# Altium PCB Main-PCB-v1.0-3.PcbDoc (part 4 of 4)
Units mm, origin at the board's own origin, x right, y up, seen from the top; angles counter-clockwise.
Board outline 222.5 x 70.56 mm, 2 copper layers (Top Layer, Bottom Layer), stack 1.448 mm thick; 252 components, 204 nets, 813 pads, 473 vias.
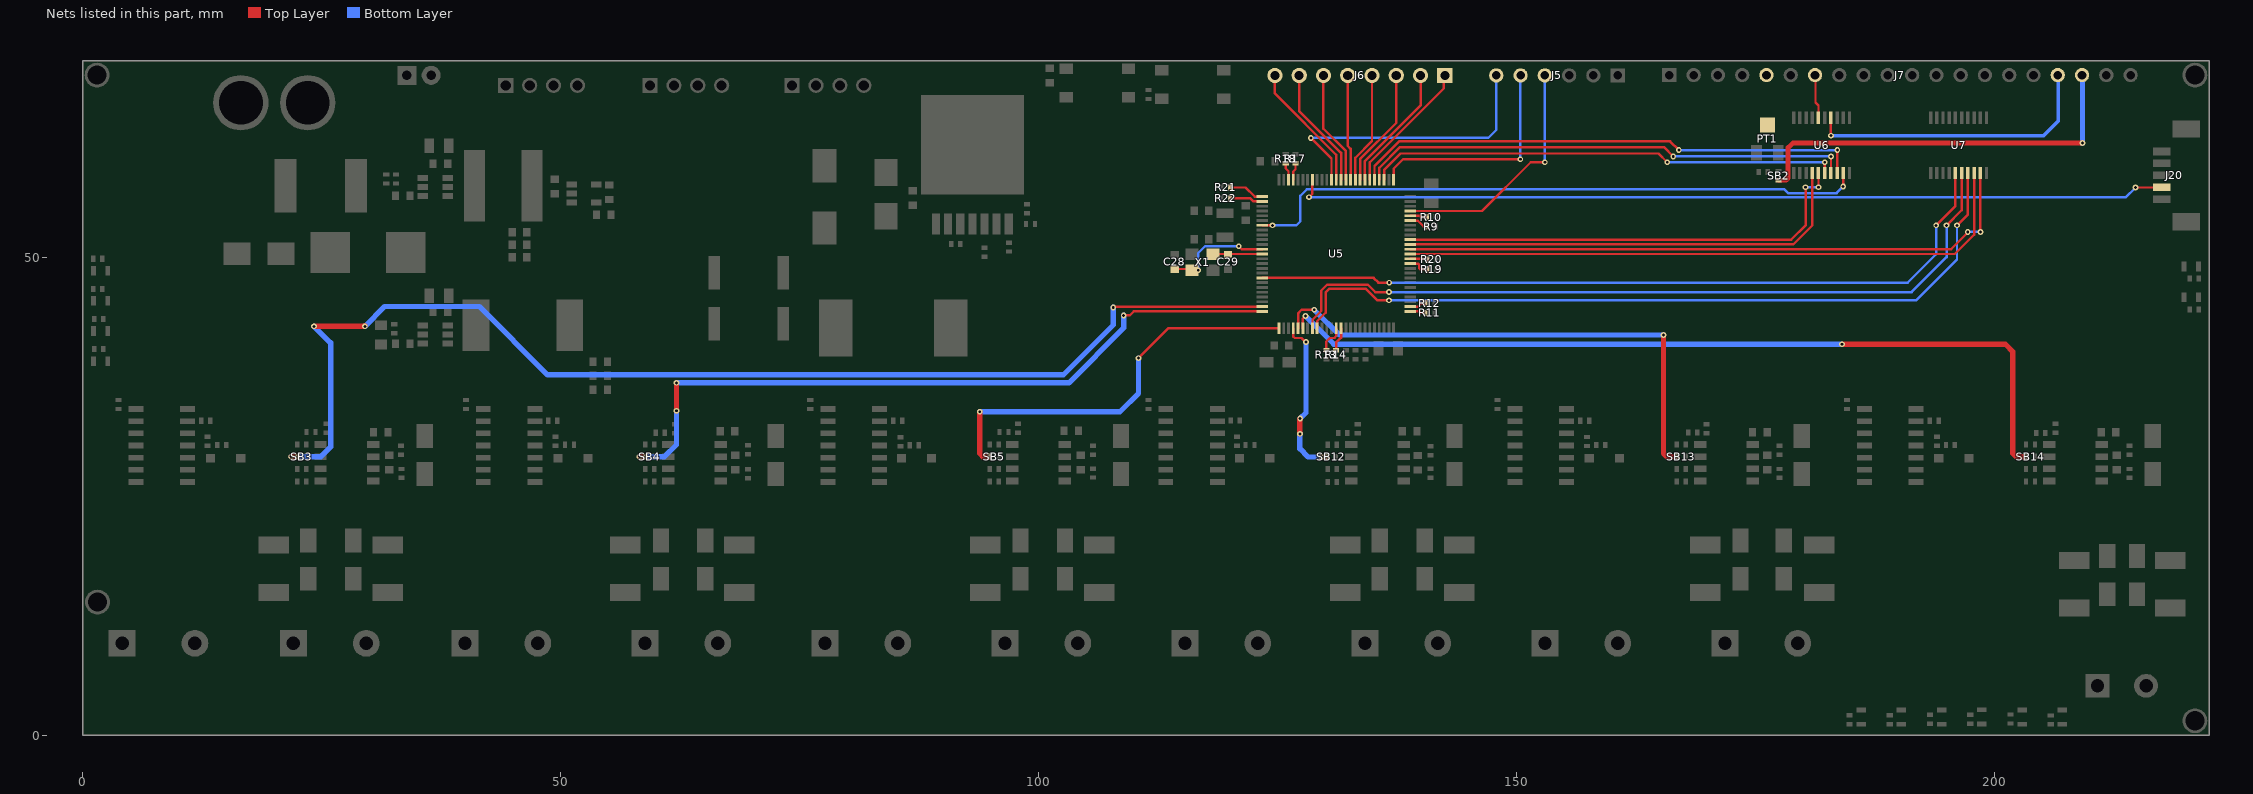
[diagram p3: the nets of this part, all layers, seen from the top]

## Via types
v1: diameter 0.6, hole 0.3, Top Layer to Bottom Layer, 473 vias

## Nets (pads, with @x,y where several pads share a name; then routed paths per layer and width w, separated by ;. In a path a pad name is that pad's centre, name@x,y a point inside that pad or via, vN(x,y) a via of type N, cw(c..) or ccw(c..) an arc to the next point about the centre after c; other vN are vias at no path point) (continued)
PC3: U5.18 U7.5 | length 81.3
  Top Layer w0.254: U5.18@123.41,47.843 135.071,47.843 135.568,47.346 v1(136.703,47.346) ; v1(193.929,53.34) 195.941,55.352 195.941,58.791 U7.5@195.946,58.797
  Bottom Layer w0.254: v1(136.703,47.346) 190.957,47.346 193.929,50.317 v1(193.929,53.34)
PC4: U5.33 U7.6 | length 81.3
  Top Layer w0.254: U5.33@128.66,42.593 128.676,42.609 128.676,43.459 129.591,44.374 129.591,46.519 130.214,47.142 134.454,47.142 135.241,46.355 v1(136.677,46.355) ; v1(195.021,53.34) 196.596,54.915 U7.6@196.596,58.797
  Bottom Layer w0.254: v1(136.677,46.355) 191.364,46.355 195.021,50.013 v1(195.021,53.34)
PC5: U5.34 U7.7 | length 82.1
  Top Layer w0.254: U5.34@129.16,42.593 129.159,42.594 129.159,43.307 130.048,44.196 130.048,46.33 130.404,46.685 134.264,46.685 135.458,45.491 v1(136.677,45.491) ; v1(196.113,53.34) 197.246,54.473 U7.7@197.246,58.797
  Bottom Layer w0.254: v1(136.677,45.491) 191.821,45.491 196.113,49.784 v1(196.113,53.34)
PC6: U5.63 U7.8 | length 66.5
  Top Layer w0.254: U5.63@138.91,50.343 195.881,50.343 197.896,52.358 U7.8@197.896,59.071
PC7: U5.64 U7.9 | length 66.6
  Top Layer w0.254: U5.64@138.91,50.843 195.494,50.843 197.231,52.58 v1(197.231,52.654) ; U7.9@198.546,58.797 198.562,58.781 v1@198.562,52.654
  Bottom Layer w0.254: v1(197.231,52.654) v1(198.577,52.654)
PC8: U5.65 U6.4 | length 48.3
  Top Layer w0.254: U5.65@138.91,51.343 178.978,51.343 180.965,53.33 U6.4@180.965,58.797
PC9: U5.66 U6.5 | length 48.8
  Top Layer w0.254: U5.66@138.91,51.843 178.771,51.843 180.264,53.336 v1(180.264,57.328) ; v1(181.615,57.328) U6.5@181.615,58.797
  Bottom Layer w0.254: v1(180.264,57.328) v1(181.615,57.328)
PC10: U5.78 U6.6 | length 49.4
  Top Layer w0.254: U5.78@136.16,58.093 136.16,59.148 137.871,60.858 164.871,60.858 v1(165.786,59.944) ; U6.6@182.265,58.797 182.268,58.799 182.268,59.941 v1(182.27,59.944)
  Bottom Layer w0.254: v1(165.786,59.944) v1(182.27,59.944)
PC11: U5.79 U6.7 | length 51.6
  Top Layer w0.254: U5.79@135.66,58.093 135.66,59.355 137.824,61.519 165.456,61.519 v1(166.421,60.554) ; U6.7@182.915,58.797 182.923,58.804 182.923,60.546 v1(182.931,60.554)
  Bottom Layer w0.254: v1(166.421,60.554) v1(182.931,60.554)
PC12: U5.80 U6.8 | length 53.8
  Top Layer w0.254: U5.80@135.16,58.093 135.16,59.562 137.727,62.128 166.091,62.128 v1(167.005,61.214) ; U6.8@183.565,58.797 183.578,58.81 183.578,61.201 v1(183.591,61.214)
  Bottom Layer w0.254: v1(167.005,61.214) v1(183.591,61.214)
PC13: U5.7 U6.9 | length 65.8
  Top Layer w0.254: U5.7@123.41,53.343 123.883,53.34 v1(124.485,53.34) ; v1(184.201,57.404) 184.208,57.411 184.208,58.789 U6.9@184.215,58.797
  Bottom Layer w0.254: v1(124.485,53.34) 126.975,53.34 127.406,53.772 127.406,56.439 128.067,57.099 178.049,57.099 178.43,56.718 183.515,56.718 v1(184.201,57.404)
PD0: J6.1 U5.81 | length 14.2
  Top Layer w0.254: U5.81@134.66,58.093 134.66,59.934 142.418,67.691 142.418,68.925 J6.1@142.519,69.026
PD1: J6.2 U5.82 | length 13.3
  Top Layer w0.254: U5.82@134.16,58.093 134.16,60.069 139.979,65.888 J6.2@139.979,69.026
PD2: J6.3 U5.83 | length 12.5
  Top Layer w0.254: U5.83@133.66,58.093 133.66,60.28 137.439,64.059 J6.3@137.439,69.026
PD3: J6.4 U5.84 | length 11.7
  Top Layer w0.254: U5.84@133.16,58.093 133.16,60.415 134.899,62.154 J6.4@134.899,69.026
PD4: J6.5 U5.85 | length 11.1
  Top Layer w0.254: J6.5@132.359,69.026 132.359,61.646 132.66,61.345 U5.85@132.66,58.093
PD5: J6.6 U5.86 | length 12.4
  Top Layer w0.254: J6.6@129.819,69.501 129.819,63.441 132.16,61.1 U5.86@132.16,58.093
PD6: J6.7 U5.87 | length 13
  Top Layer w0.254: J6.7@127.279,69.303 127.279,65.299 131.66,60.918 U5.87@131.66,58.093
PD7: J6.8 U5.88 | length 13.9
  Top Layer w0.254: J6.8@124.739,69.315 124.739,67.132 131.16,60.711 U5.88@131.16,58.093
RS485_CH1_DE_RE: SB3.1 U5.24 | length 125.6
  Top Layer w0.254: v1(107.823,44.755) 107.888,44.82 123.387,44.82 U5.24@123.41,44.843
  Top Layer w0.559: v1(21.808,29.134) SB3.1@22.461,29.134 ; v1(24.206,42.774) 29.453,42.774 29.504,42.824 v1@29.515,42.824
  Bottom Layer w0.559: v1(21.808,29.134) 24.917,29.134 25.933,30.15 25.933,41.046 v1(24.206,42.774) ; v1(29.515,42.774) 31.584,44.843 41.492,44.843 48.641,37.694 102.591,37.694 107.823,42.926 v1(107.823,44.755)
RS485_CH2_DE_RE: SB4.1 U5.25 | length 76.6
  Top Layer w0.254: v1(108.915,43.917) 109.55,43.917 109.976,44.343 U5.25@123.41,44.343
  Top Layer w0.559: v1(58.263,29.134) SB4.1@58.834,29.134 ; v1(62.128,33.934) v1(62.128,36.855)
  Bottom Layer w0.559: v1(58.263,29.134) 60.878,29.134 62.128,30.384 v1(62.128,33.934) ; v1(62.128,36.855) 103.175,36.855 108.915,42.596 v1(108.915,43.917)
RS485_CH3_DE_RE: SB5.1 U5.26 | length 42.6
  Top Layer w0.254: v1(110.465,39.446) 113.611,42.593 U5.26@125.16,42.593
  Top Layer w0.559: v1(93.853,33.833) 93.853,29.461 94.18,29.134 SB5.1@94.907,29.134
  Bottom Layer w0.559: v1@93.864,33.833 108.534,33.833 110.465,35.763 v1(110.465,39.446)
RS485_CH4_DE_RE: SB12.1 U5.29 | length 17
  Top Layer w0.254: U5.29@126.66,42.593 126.66,41.703 126.809,41.554 127.526,41.554 127.958,41.123 v1(127.991,41.123)
  Top Layer w0.559: v1@127.356,31.533 127.356,33.085 127.381,33.11 v1(127.381,33.122) ; v1(129.616,29.108) SB12.1@130.162,29.108
  Bottom Layer w0.559: v1(127.356,31.521) 127.356,29.972 128.219,29.108 v1(129.616,29.108) ; v1(127.381,33.122) 127.991,33.731 v1(127.991,41.123)
RS485_CH5_DE_RE: SB13.1 U5.30 | length 54.9
  Top Layer w0.254: U5.30@127.16,42.593 127.16,44.128 127.533,44.501 v1(128.854,44.501)
  Top Layer w0.559: v1(165.405,41.859) 165.405,29.461 165.732,29.134 SB13.1@166.784,29.134
  Bottom Layer w0.559: v1(128.854,44.501) 131.496,41.859 v1(165.405,41.859)
RS485_CH6_DE_RE: SB14.1 U5.31 | length 89.1
  Top Layer w0.254: U5.31@127.66,42.593 127.66,43.586 v1(127.94,43.866)
  Top Layer w0.559: v1(184.074,40.894) 201.168,40.894 201.955,40.107 201.955,29.461 202.283,29.134 SB14.1@203.335,29.134
  Bottom Layer w0.559: v1(127.94,43.866) 130.912,40.894 v1(184.074,40.894)
RST_LCD: J7.17 U6.14 | length 31.1
  Top Layer w0.254: v1(182.915,62.722) U6.14@182.915,64.597
  Bottom Layer w0.381: v1(182.915,62.722) 205.166,62.722 206.705,64.262 J7.17@206.705,69.063
RW_LCD: J7.7 U6.16 | length 4.6
  Top Layer w0.254: J7.7@181.305,69.063 181.305,66.192 181.615,65.882 U6.16@181.615,64.597
SWCLK: J5.5 U5.76 | length 23.6
  Top Layer w0.254: U5.76@137.16,58.093 137.16,59.262 138.147,60.249 v1(150.419,60.249)
  Bottom Layer w0.254: v1(150.419,60.249) 150.431,60.261 150.431,69.013 J5.5@150.444,69.026
SWDIO: J5.4 U5.72 | length 25.3
  Top Layer w0.254: U5.72@138.91,54.843 146.41,54.843 151.511,59.944 v1(152.984,59.944)
  Bottom Layer w0.254: J5.4@152.984,69.026 152.984,59.969 v1@153.01,59.944
SWO: J5.6 U5.89 | length 30.7
  Top Layer w0.254: v1(128.499,62.484) 130.66,60.322 U5.89@130.66,58.093
  Bottom Layer w0.254: v1(128.499,62.484) 147.07,62.484 147.904,63.319 J5.6@147.904,69.026
UART4_RX: R9.1 U5.70 | length 2.1
  Top Layer w0.254: U5.70@138.91,53.843 138.916,53.837 139.686,53.837 140.31,53.213 R9.1@140.622,53.213 140.622,53.244 R9.1@140.52,53.345
UART4_TX: R10.1 U5.71 | length 1.8
  Top Layer w0.254: U5.71@138.91,54.343 139.891,54.343 140.03,54.204 R10.1@140.622,54.204
UART5_RX: R11.1 U5.51 | length 1.7
  Top Layer w0.254: U5.51@138.91,44.343 139.833,44.343 140.005,44.171 R11.1@140.495,44.171
UART5_TX: R12.1 U5.52 | length 1.7
  Top Layer w0.254: U5.52@138.91,44.843 139.739,44.843 140.034,45.138 140.421,45.138 R12.1@140.495,45.212
UART7_RX: R13.1 U5.38 | length 3
  Top Layer w0.254: R13.1@130.119,40.272 130.119,41.168 130.505,41.554 130.962,41.554 131.166,41.758 131.166,42.588 U5.38@131.16,42.593
UART7_TX: R14.1 U5.39 | length 2.5
  Top Layer w0.254: R14.1@131.141,40.272 131.141,41.073 131.66,41.592 U5.39@131.66,42.593
UART8_RX: R17.1 U5.97 | length 1.9
  Top Layer w0.254: U5.97@126.66,58.093 126.66,58.969 126.893,59.202 R17.1@126.893,59.855
UART8_TX: R18.1 U5.98 | length 1.9
  Top Layer w0.254: R18.1@125.877,59.855 125.877,59.289 126.16,59.006 U5.98@126.16,58.093
UART9_RX: R19.1 U5.61 | length 2.4
  Top Layer w0.254: U5.61@138.91,49.343 139.716,49.343 139.827,49.232 139.827,48.844 139.929,48.743 R19.1@140.665,48.743 140.665,48.753 R19.1@140.564,48.854
UART9_TX: R20.1 U5.62 | length 1.7
  Top Layer w0.254: U5.62@138.91,49.843 140.597,49.843 R20.1@140.64,49.886
UART10_RX: R21.1 U5.1 | length 3.7
  Top Layer w0.254: R21.1@120.073,57.302 121.666,57.302 122.628,56.341 123.408,56.341 U5.1@123.41,56.343
UART10_TX: R22.1 U5.2 | length 3.5
  Top Layer w0.254: R22.1@120.048,56.159 122.174,56.159 122.491,55.843 U5.2@123.41,55.843
V0: J7.5 PT1.2
V_EN: J20.2 U5.93 | length 91.6
  Top Layer w0.254: v1(128.295,56.286) 128.66,56.651 U5.93@128.66,58.093 ; v1(214.782,57.302) 217.522,57.302 J20.2@217.541,57.321
  Bottom Layer w0.254: v1(128.295,56.286) 213.792,56.286 v1@214.782,57.277
VEE: J7.18 SB2.1 | length 42.4
  Top Layer w0.508: SB2.1@177.45,58.052 178.219,58.052 178.435,58.268 178.435,61.468 178.918,61.951 v1(209.245,61.951)
  Bottom Layer w0.559: v1(209.245,61.951) J7.18@209.245,69.063
XTAL_IN: C28.2 U5.12 X1.1 | length 11.4
  Top Layer w0.254: C28.2@114.32,48.768 115.926,48.768 X1.1@116.065,48.629 116.077,48.641 v1(116.713,48.641) ; v1(120.955,51.156) 121.268,50.843 U5.12@123.41,50.843
  Bottom Layer w0.254: v1(116.713,48.641) 116.713,50.444 117.424,51.156 v1(120.955,51.156)
XTAL_OUT: C29.2 U5.13 X1.3 | length 5.2
  Top Layer w0.254: X1.3@118.265,50.329 118.279,50.343 U5.13@123.41,50.343
pads on no net: U5.3 U5.4 U5.5 U5.23 U5.32 U5.35 U5.36 U5.37 U5.43 U5.44 U5.45 U5.46 U5.47 U5.53 U5.54 U5.55 U5.56 U5.57 U5.58 U5.59 U5.60 U5.67 U5.68 U5.69 U5.77 U5.90 U5.95 U5.96 U6.1 U6.3 U6.18 U6.20

## Polygon pours and split planes (outlines as drawn)
GND on Bottom Layer "GND_L02_P001" (solid, remove dead copper, pour order 1): 2.515,67.97 219.964,67.97 219.964,2.54 219.939,2.54 2.515,2.54
GND on Top Layer "GND_L01_P000" (solid, remove dead copper, pour order 0): 2.515,67.97 219.964,67.97 219.964,2.54 219.939,2.54 2.515,2.54

## Other copper
Top Layer:
  rectangle net 12V: 0.635,16.129 4.775,18.411
  region net 12V: 3.146,18.415 3.146,10.265 4.826,10.265 4.826,18.415
  region net 12V: 0.657,36.961 0.657,16.993 2.718,16.993 2.718,36.961
  region net 12V: 9.224,37.516 0.66,37.516 0.66,36.097 9.224,36.097
  region net 12V: 20.549,38.281 4.115,38.281 4.115,36.093 20.549,36.093
  region net 12V: 50.927,37.44 50.927,39.134 4.115,39.134 4.115,37.44
  rectangle net MCU_UART1_RX: 4.724,28.626 6.756,30.607
  rectangle net NetC3_1: 37.541,41.504 40.185,42.367
  rectangle net NetC3_1: 39.624,39.345 42.647,45.593
  rectangle net 12V: 30.404,37.49 32.004,41.402
  rectangle net 24V: 99.39,51.867 101.422,53.848
  rectangle net NetC15_1: 82.779,50.825 91.288,51.918
  rectangle net NetC15_1: 82.347,50.825 85.776,55.804
  rectangle net NetC15_1: 88.976,39.573 91.288,51.816
  region net 12V: 44.704,12.116 36.17,12.116 36.17,0.102 44.704,0.102
  region net 12V: 8.821,12.116 0.286,12.116 0.286,0.102 8.821,0.102
  region net 12V: 44.704,0.102 44.704,7.264 0.305,7.264 0.305,0.102
  region net 24V: 156.808,0.127 156.808,7.29 112.409,7.29 112.409,0.127
  region net 24V: 120.924,12.141 109.377,12.141 109.377,0.127 120.924,0.127
  region net 24V: 156.808,12.141 148.273,12.141 148.273,0.127 156.808,0.127
  region net 24V: 118.254,0.127 118.254,7.29 73.855,7.29 73.855,0.127
  rectangle net 24V: 70.942,0.127 82.389,12.141
  rectangle net BATT: 74.727,50.495 80.239,55.829
  rectangle net GND: 213.563,67.259 218.745,70.18
  region net 24V: 79.417,11.151 71.12,11.151 71.12,8.128 79.417,8.128
  rectangle net 24V: 70.917,8.255 73.66,24.816
  rectangle net 24V: 55.702,23.444 56.998,40.208
  rectangle net NetD1_2: 18.999,48.285 29.769,53.162
  rectangle net NetD1_2: 27.127,48.285 29.769,60.427
  rectangle net BATT: 27.153,62.941 39.421,67.208
  rectangle net 24V: 55.702,39.192 80.95,45.618
  rectangle net BATT: 86.208,54.94 86.843,55.956
  rectangle net 3.3V: 121.183,65.024 123.241,70.307
  rectangle net NRST: 102.184,65.735 110.185,67.31
  rectangle net RS485_CH3_DE_RE: 94.544,28.804 95.25,29.464
  rectangle net GND: 213.563,60.63 221.539,67.259
  rectangle net MCU_UART3_TX: 130.791,39.091 131.477,39.675
  rectangle net MCU_UART3_RX: 129.769,39.091 130.454,39.675
  rectangle net GND: 218.669,50.825 221.539,64.414
  rectangle net 3.3V: 117.932,33.757 138.869,36.347
  rectangle net 5V: 45.872,49.403 48.158,66.523
  rectangle net GND: 36.373,55.855 37.287,56.718
  rectangle net 5V: 31.42,56.667 32.106,57.988
  rectangle net GND: 32.461,57.442 33.147,58.001
  rectangle net GND: 35.23,59.334 37.287,62.535
  rectangle net GND: 145.999,12.37 151.181,26.949
  rectangle net GND: 158.865,8.128 164.504,24.282
  rectangle net GND: 145.999,12.37 164.504,24.282
  rectangle net GND: 112.497,12.37 115.291,26.975
  rectangle net GND: 121.199,8.128 126.837,24.282
  rectangle net GND: 112.497,12.37 126.837,24.282
  rectangle net GND: 74.016,12.37 80.433,26.873
  rectangle net GND: 83.532,8.128 89.171,24.282
  rectangle net GND: 78.3,12.37 89.171,24.282
  rectangle net GND: 39.472,12.37 42.767,26.873
  rectangle net GND: 45.866,8.128 51.504,24.282
  rectangle net GND: 40.633,12.37 51.504,24.282
  rectangle net GND: 5.334,12.37 15.621,24.282
  rectangle net GND: 9.982,8.128 15.621,24.282
  rectangle net GND: 4.75,18.872 7.518,26.873
  rectangle net 3.3V: 46.487,33.503 53.848,35.433
  rectangle net RS485_CH6_DE_RE: 203.098,28.804 203.632,29.464
  rectangle net RS485_CH5_DE_RE: 166.548,28.804 167.081,29.464
  rectangle net 3.3V: 157.531,53.594 179.603,57.302
  rectangle net 3.3V: 157.531,53.594 164.846,60.376
  rectangle net 5V: 216.84,55.563 218.465,56.579
  rectangle net XTAL_IN: 113.792,48.006 117.018,49.225
  rectangle net 3.3V: 122.809,45.695 124.547,46.507
  region net MCU_UART6_RX: 119.413,57.556 118.854,57.556 118.854,56.921 119.413,56.921
  rectangle net GND: 121.234,54.585 122.123,55.778
  rectangle net 3.3V: 48.438,59.03 55.722,63.144
  rectangle net GND: 50.775,65.557 64.872,66.929
  rectangle net GND: 50.775,66.065 52.654,70.307
  rectangle net GND: 65.862,66.065 67.742,70.307
  rectangle net MCU_UART5_RX: 141.326,48.412 141.834,49.073
  rectangle net MCU_UART4_RX: 126.568,60.427 127.229,61.025
  rectangle net MCU_UART4_TX: 125.552,60.427 126.213,61.025
  region net MCU_UART2_TX: 141.714,45.517 141.155,45.517 141.155,44.806 141.714,44.806
  rectangle net MCU_UART2_RX: 141.155,43.917 141.714,44.552
  rectangle net GND: 54.254,32.563 55.499,39.649
  rectangle net MCU_UART1_RX: 141.224,52.883 141.85,53.543
  rectangle net MCU_UART1_TX: 141.224,53.873 141.85,54.534
  rectangle net GND: 13.068,32.563 13.627,33.122
  rectangle net GND: 49.385,32.563 55.474,33.299
  rectangle net GND: 85.479,32.563 86.037,33.122
  rectangle net GND: 120.79,32.588 121.349,33.147
  rectangle net GND: 157.335,32.563 157.894,33.122
  rectangle net GND: 193.911,32.563 194.47,33.299
  region net 3.3V: 201.295,35.687 182.702,35.687 182.702,34.646 201.295,34.646
  rectangle net 3.3V: 191.008,33.757 195.021,35.433
  region net 3.3V: 156.134,35.687 146.279,35.687 146.279,34.646 156.134,34.646
  rectangle net 3.3V: 154.457,33.757 156.134,35.433
  region net 3.3V: 119.609,36.855 83.617,36.855 83.617,34.646 119.609,34.646
  rectangle net 3.3V: 117.932,33.757 119.609,35.433
  region net 3.3V: 84.201,36.855 66.065,36.855 66.065,34.646 84.201,34.646
  rectangle net 3.3V: 82.525,33.757 84.201,35.433
  region net 3.3V: 48.164,35.433 25.07,35.433 25.07,34.646 48.164,34.646
  rectangle net 3.3V: 10.16,33.757 11.836,35.433
  region net 3.3V: 11.836,35.433 3.378,35.433 3.378,34.646 11.836,34.646
  region net NetLED3_2: 184.522,1.41 184.522,0.724 186.706,0.724 186.706,1.41
  region net NetLED6_2: 188.733,1.41 188.733,0.724 190.917,0.724 190.917,1.41
  region net NetLED7_2: 192.943,1.46 192.943,0.775 195.127,0.775 195.127,1.46
  region net NetLED10_2: 197.154,1.46 197.154,0.775 199.338,0.775 199.338,1.46
  region net NetLED8_2: 201.364,1.486 201.364,0.8 203.548,0.8 203.548,1.486
  region net NetLED11_2: 205.575,1.384 205.575,0.698 207.759,0.698 207.759,1.384
  rectangle net 3.3V: 33.02,26.06 33.68,27.153
  rectangle net 3.3V: 69.291,26.035 69.952,27.127
  rectangle net 3.3V: 105.39,26.098 106.05,27.191
  rectangle net 3.3V: 140.696,26.086 141.356,27.178
  rectangle net 3.3V: 177.216,26.06 177.876,27.153
  rectangle net 3.3V: 213.843,26.06 214.503,27.153
  region net NetLED12_2: 221.678,46.386 220.993,46.386 220.993,44.202 221.678,44.202
  region net NetLED9_2: 221.678,49.603 220.993,49.603 220.993,47.418 221.678,47.418
  rectangle net 3.3V: 112.192,68.91 123.241,70.307
  rectangle net GND: 110.973,67.285 111.963,70.307
  rectangle net GND: 97.358,69.139 111.963,70.307
  rectangle net GND: 1.829,43.234 2.362,43.869
  rectangle net GND: 1.829,40.087 2.362,40.722
  rectangle net GND: 1.753,49.527 2.286,50.162
  rectangle net GND: 1.753,46.38 2.286,47.015
  rectangle net GND: 63.856,46.253 74.524,59.969
  rectangle net NetLED5_2: 0.813,48.014 1.499,50.199
  rectangle net NetLED2_2: 0.813,44.862 1.499,47.046
  rectangle net NetLED4_2: 0.813,41.71 1.499,43.894
  rectangle net NetLED1_2: 0.813,38.557 1.499,40.742
  rectangle net EARTH: 22.733,15.113 29.235,17.653
  region net NetD7_2: 24.524,21.666 18.301,21.666 18.301,18.999 24.524,18.999
  rectangle net NetD7_1: 27.229,18.999 33.503,21.666
  rectangle net EARTH: 59.639,15.113 66.015,17.653
  region net NetD8_2: 61.43,21.666 55.207,21.666 55.207,18.999 61.43,18.999
  rectangle net NetD8_1: 64.135,18.999 70.358,21.666
  rectangle net NetF3_2: 30.273,8.128 33.55,15.85
  rectangle net NetF3_2: 27.911,8.128 33.55,11.151
  region net NetF2_2: 24,11.151 18.361,11.151 18.361,8.128 24,8.128
  region net NetF2_2: 21.637,15.85 18.361,15.85 18.361,8.128 21.637,8.128
  rectangle net NetF5_2: 67.061,8.128 70.338,15.85
  rectangle net NetF5_2: 64.699,8.128 70.338,11.151
  region net NetF4_2: 60.787,11.151 55.148,11.151 55.148,8.128 60.787,8.128
  region net NetF4_2: 58.425,15.85 55.148,15.85 55.148,8.128 58.425,8.128
  rectangle net NetF7_2: 104.728,8.128 108.004,15.85
  rectangle net NetF7_2: 102.365,8.128 108.004,11.151
  region net NetF6_2: 98.454,11.151 92.815,11.151 92.815,8.128 98.454,8.128
  region net NetF6_2: 96.092,15.85 92.815,15.85 92.815,8.128 96.092,8.128
  rectangle net NetD9_1: 101.422,18.999 107.975,21.666
  region net NetD9_2: 99.441,21.666 92.824,21.666 92.824,18.999 99.441,18.999
  rectangle net EARTH: 97.257,15.113 103.632,17.653
  rectangle net NetD19_1: 139.344,18.999 145.669,21.666
  region net NetD19_2: 136.639,21.666 130.416,21.666 130.416,18.999 136.639,18.999
  rectangle net EARTH: 134.849,15.113 141.326,17.653
  rectangle net NetF9_2: 142.394,8.128 145.671,15.85
  rectangle net NetF9_2: 140.032,8.128 145.671,11.151
  region net NetF8_2: 136.12,11.151 130.481,11.151 130.481,8.128 136.12,8.128
  region net NetF8_2: 133.758,15.85 130.481,15.85 130.481,8.128 133.758,8.128
  rectangle net EARTH: 172.593,15.113 178.867,17.653
  region net NetF10_2: 171.425,15.85 168.148,15.85 168.148,8.128 171.425,8.128
  region net NetF10_2: 173.787,11.151 168.148,11.151 168.148,8.128 173.787,8.128
  rectangle net NetF11_2: 177.698,8.128 183.337,11.151
  rectangle net NetF11_2: 180.061,8.128 183.337,15.85
  region net NetD20_2: 174.384,21.666 168.161,21.666 168.161,18.999 174.384,18.999
  rectangle net NetD20_1: 177.089,18.999 183.312,21.666
  rectangle net EARTH: 210.871,13.31 215.849,16.053
  region net NetD21_2: 212.765,20.015 206.695,20.015 206.695,17.297 212.765,17.297
  rectangle net NetD21_1: 214.02,17.297 220.091,20.015
  region net NetF12_2: 210.022,14.148 206.619,14.148 206.619,3.683 210.022,3.683
  region net NetF12_2: 212.486,6.655 206.619,6.655 206.619,3.683 212.486,3.683
  rectangle net NetF13_2: 214.325,3.683 220.193,6.655
  rectangle net NetF13_2: 216.789,3.683 220.193,14.148
  region net NetC41_2: 197.957,30.709 195.461,30.709 195.461,28.473 197.957,28.473
  rectangle net NetR77_2: 204.02,30.023 206.433,30.836
  region net NetR77_2: 204.02,32.131 204.02,30.023 204.833,30.023 204.833,32.131
  rectangle net NetR71_1: 193.538,30.937 194.097,31.496
  rectangle net MCU_UART6_RX: 185.613,28.727 187.289,30.734
  region net MCU_UART6_TX: 203.604,26.873 203.045,26.873 203.045,26.264 203.604,26.264
  rectangle net MCU_UART6_RX: 203.045,30.048 203.604,30.658
  region net NetD21_1: 214.62,28.423 210.596,28.423 210.596,27.356 214.62,27.356
  region net NetD21_2: 214.62,29.693 210.596,29.693 210.596,28.702 214.62,28.702
  region net 3.3V: 211.978,33.122 210.596,33.122 210.596,30.023 211.978,30.023
  region net 3.3V: 211.978,61.468 205.997,61.468 205.997,32.309 211.978,32.309
  region net NetR76_1: 207.007,31.979 205.167,31.979 205.167,31.166 207.007,31.166
  rectangle net NetR80_2: 203.944,27.508 206.451,29.591
  rectangle net NetR71_1: 203.977,26.162 206.484,26.975
  rectangle net NetD18_2: 191.049,28.473 195.24,29.439
  rectangle net NetD18_2: 193.411,28.473 195.24,30.709
  region net MCU_UART6_TX: 187.289,34.442 184.241,34.442 184.241,33.655 187.289,33.655
  rectangle net NetC41_2: 190.972,32.512 193.487,33.299
  rectangle net NetR80_1: 202.998,27.508 203.622,28.169
  region net GND: 214.648,33.122 212.199,33.122 212.199,30.023 214.648,30.023
  region net GND: 178.072,33.122 175.623,33.122 175.623,30.023 178.072,30.023
  rectangle net NetR79_1: 166.422,27.508 167.046,28.169
  rectangle net NetC40_2: 154.396,32.512 156.911,33.299
  region net MCU_UART5_TX: 150.713,34.442 147.665,34.442 147.665,33.655 150.713,33.655
  rectangle net NetD17_2: 156.835,28.473 158.664,30.709
  rectangle net NetD17_2: 154.473,28.473 158.664,29.439
  rectangle net NetR70_1: 167.401,26.162 169.908,26.975
  rectangle net NetR79_2: 167.401,27.432 169.908,29.515
  region net NetR74_1: 170.431,31.979 168.591,31.979 168.591,31.166 170.431,31.166
  region net 3.3V: 175.402,33.122 169.421,33.122 169.421,32.309 175.402,32.309
  region net 3.3V: 175.402,33.122 174.02,33.122 174.02,30.023 175.402,30.023
  region net NetD20_2: 178.044,29.693 174.02,29.693 174.02,28.702 178.044,28.702
  region net NetD20_1: 178.044,28.423 174.02,28.423 174.02,27.356 178.044,27.356
  rectangle net MCU_UART5_RX: 166.469,30.048 167.028,30.658
  region net MCU_UART5_TX: 167.028,26.873 166.469,26.873 166.469,26.264 167.028,26.264
  rectangle net MCU_UART5_RX: 149.037,28.727 150.713,30.734
  rectangle net NetR70_1: 156.962,30.937 157.521,31.496
  region net NetR75_2: 167.495,32.131 167.495,30.023 168.308,30.023 168.308,32.131
  rectangle net NetR75_2: 167.495,30.023 169.908,30.836
  region net NetC40_2: 161.381,30.709 158.885,30.709 158.885,28.473 161.381,28.473
  region net NetC39_2: 124.849,30.709 122.352,30.709 122.352,28.473 124.849,28.473
  rectangle net NetR73_2: 130.962,30.023 133.375,30.836
  region net NetR73_2: 130.962,32.131 130.962,30.023 131.775,30.023 131.775,32.131
  rectangle net NetR69_1: 120.429,30.937 120.988,31.496
  rectangle net MCU_UART4_RX: 112.504,28.727 114.181,30.734
  region net MCU_UART4_TX: 130.495,26.873 129.936,26.873 129.936,26.264 130.495,26.264
  rectangle net MCU_UART4_RX: 129.936,30.048 130.495,30.658
  region net NetD19_1: 141.511,28.423 137.487,28.423 137.487,27.356 141.511,27.356
  region net NetD19_2: 141.511,29.693 137.487,29.693 137.487,28.702 141.511,28.702
  region net 3.3V: 138.869,33.122 137.487,33.122 137.487,30.023 138.869,30.023
  region net 3.3V: 138.869,34.569 132.888,34.569 132.888,32.309 138.869,32.309
  region net NetR72_1: 133.899,31.979 132.058,31.979 132.058,31.166 133.899,31.166
  rectangle net NetR78_2: 130.868,27.432 133.375,29.515
  rectangle net NetR69_1: 130.868,26.162 133.375,26.975
  rectangle net NetD16_2: 117.94,28.473 122.131,29.439
  rectangle net NetD16_2: 120.302,28.473 122.131,30.709
  region net MCU_UART4_TX: 114.18,34.442 111.133,34.442 111.133,33.655 114.18,33.655
  rectangle net NetC39_2: 117.864,32.512 120.378,33.299
  rectangle net NetR78_1: 129.889,27.508 130.513,28.169
  region net GND: 141.539,33.122 139.09,33.122 139.09,30.023 141.539,30.023
  region net GND: 106.182,33.122 103.734,33.122 103.734,30.023 106.182,30.023
  rectangle net NetR47_1: 94.532,27.508 95.156,28.169
  rectangle net NetC35_2: 82.507,32.512 85.021,33.299
  region net MCU_UART3_TX: 78.824,34.442 75.776,34.442 75.776,33.655 78.824,33.655
  rectangle net NetD6_2: 84.945,28.473 86.774,30.709
  rectangle net NetD6_2: 82.583,28.473 86.774,29.439
  region net NetC35_2: 89.492,30.709 87.119,30.709 87.119,28.473 89.492,28.473
  rectangle net NetR38_1: 95.512,26.162 97.925,26.975
  rectangle net NetR47_2: 95.512,27.432 97.925,29.515
  rectangle net NetR44_2: 95.512,29.972 97.925,30.785
  region net NetR44_2: 95.435,32.08 95.435,29.972 96.248,29.972 96.248,32.08
  region net NetR43_1: 98.306,32.08 96.465,32.08 96.465,31.267 98.306,31.267
  region net 3.3V: 103.513,34.849 97.532,34.849 97.532,32.309 103.513,32.309
  region net 3.3V: 103.513,33.122 102.083,33.122 102.083,30.023 103.513,30.023
  region net NetD9_2: 106.154,29.693 102.108,29.693 102.108,28.702 106.154,28.702
  region net NetD9_1: 106.154,28.448 102.108,28.448 102.108,27.381 106.154,27.381
  rectangle net MCU_UART3_RX: 94.579,30.048 95.138,30.658
  region net MCU_UART3_TX: 95.138,26.873 94.579,26.873 94.579,26.264 95.138,26.264
  rectangle net MCU_UART3_RX: 77.147,28.727 78.824,30.734
  rectangle net NetR38_1: 85.072,30.937 85.631,31.496
  rectangle net NetR37_1: 59.487,26.162 61.9,26.975
  rectangle net NetR46_2: 59.487,27.432 61.9,29.515
  rectangle net NetR42_2: 59.487,29.972 61.9,30.785
  region net NetR42_2: 59.411,32.08 59.411,29.972 60.223,29.972 60.223,32.08
  region net NetR41_1: 62.281,32.08 60.44,32.08 60.44,31.267 62.281,31.267
  region net 3.3V: 67.488,33.122 59.411,33.122 59.411,32.309 67.488,32.309
  region net 3.3V: 67.488,36.855 62.636,36.855 62.636,30.023 67.488,30.023
  region net GND: 70.155,33.122 67.706,33.122 67.706,30.023 70.155,30.023
  region net NetD8_2: 70.129,29.693 66.106,29.693 66.106,28.702 70.129,28.702
  region net NetD8_1: 70.129,28.423 66.106,28.423 66.106,27.356 70.129,27.356
  rectangle net MCU_UART2_RX: 58.555,30.048 59.113,30.658
  region net MCU_UART2_TX: 59.113,26.873 58.555,26.873 58.555,26.264 59.113,26.264
  rectangle net RS485_CH2_DE_RE: 58.507,28.804 59.131,29.464
  rectangle net NetR46_1: 58.507,27.508 59.131,28.169
  region net NetC34_2: 53.431,30.709 51.059,30.709 51.059,28.473 53.431,28.473
  rectangle net NetD5_2: 48.885,28.473 50.714,30.709
  rectangle net NetD5_2: 46.523,28.473 50.714,29.439
  rectangle net NetR37_1: 49.012,30.937 49.571,31.496
  rectangle net NetR36_1: 12.675,30.937 13.233,31.496
  rectangle net NetC34_2: 46.446,32.512 48.961,33.299
  region net MCU_UART2_TX: 42.763,34.442 39.715,34.442 39.715,33.655 42.763,33.655
  rectangle net MCU_UART2_RX: 41.087,28.727 42.763,30.734
  rectangle net MCU_UART1_RX: 4.75,28.626 8.153,29.642
  rectangle net NetR45_1: 22.135,27.508 22.758,28.169
  rectangle net RS485_CH1_DE_RE: 22.135,28.804 22.758,29.464
  region net MCU_UART1_TX: 22.741,26.873 22.182,26.873 22.182,26.264 22.741,26.264
  rectangle net MCU_UART1_RX: 22.182,30.048 22.741,30.658
  region net NetD7_1: 33.757,28.423 29.733,28.423 29.733,27.356 33.757,27.356
  region net NetD7_2: 33.757,29.693 29.733,29.693 29.733,28.702 33.757,28.702
  region net GND: 33.782,33.122 31.333,33.122 31.333,30.023 33.782,30.023
  region net 3.3V: 31.115,33.122 29.733,33.122 29.733,30.023 31.115,30.023
  region net 3.3V: 31.115,35.433 23.216,35.433 23.216,32.309 31.115,32.309
  region net NetR39_1: 25.908,32.08 24.067,32.08 24.067,31.267 25.908,31.267
  region net NetR40_2: 23.038,32.08 23.038,29.972 23.851,29.972 23.851,32.08
  rectangle net NetR40_2: 23.114,29.972 25.527,30.785
  rectangle net NetR45_2: 23.114,27.432 25.527,29.515
  rectangle net NetR36_1: 23.114,26.162 25.527,26.975
  region net NetC33_2: 17.094,30.709 14.722,30.709 14.722,28.473 17.094,28.473
  rectangle net NetD4_2: 10.185,28.473 14.376,29.439
  rectangle net NetD4_2: 12.548,28.473 14.376,30.709
  region net MCU_UART1_TX: 7.442,34.442 3.378,34.442 3.378,33.655 7.442,33.655
  rectangle net NetC33_2: 10.109,32.512 12.649,33.299
  rectangle net GND: 137.008,39.014 138.227,41.3
  rectangle net GND: 131.826,39.014 138.227,39.548
  region net 3.3V: 127.401,41.224 125.496,41.224 125.496,38.456 127.401,38.456
  rectangle net GND: 123.139,38.456 125.044,41.224
  region net GND: 121.31,49.301 117.546,49.301 117.546,48.006 121.31,48.006
  region net GND: 116.967,49.657 116.967,55.383 113.817,55.383 113.817,49.657
  rectangle net NetC30_1: 117.424,54.087 120.447,55.383
  rectangle net NetC31_1: 117.424,51.308 120.447,52.603
  region net NetC15_1: 91.161,51.13 91.161,51.74 90.647,51.74 90.647,51.13
  rectangle net BATT: 90.038,52.324 91.054,54.178
  rectangle net NetC15_2: 91.536,51.079 92.095,51.638
  rectangle net NetR6_2: 94.031,50.686 94.691,51.219
  rectangle net NetC12_2: 96.571,51.232 97.231,51.765
  rectangle net NetR5_2: 98.349,51.333 99.085,54.864
  rectangle net GND: 80.924,63.449 98.425,70.307
  rectangle net GND: 63.856,56.591 98.4,66.929
  rectangle net NetD1_1: 30.023,48.311 36.652,54.356
  rectangle net 3.3V: 124.028,57.48 125.324,62.179
  rectangle net NetPT1_1: 176.098,58.598 177.978,61.773
  rectangle net V0: 175.387,62.916 177.241,69.977
  rectangle net GND: 12.914,43.739 37.084,46.838
  rectangle net BATT: 37.567,42.545 39.141,47.981
  rectangle net NetR1_1: 30.582,42.545 36.144,43.332
  rectangle net 12V: 49.505,35.662 53.848,45.568
  rectangle net GND: 37.236,49.403 39.192,56.718
  rectangle net GND: 37.77,49.403 45.441,53.188
  region net 5V: 51.968,54.432 51.968,56.032 49.632,56.032 49.632,54.432
  region net 3.3V: 60.198,56.744 60.198,63.144 52.934,63.144 52.934,56.744
  rectangle net GND: 54.483,46.253 65.964,56.49
  rectangle net NetC7_2: 52.934,53.823 54.305,56.159
  rectangle net 5V: 47.701,57.277 51.74,58.801
  rectangle net GND: 48.946,56.363 51.689,56.972
  rectangle net 5V: 41.808,62.078 48.158,66.523
  rectangle net 5V: 41.808,62.078 45.415,70.155
  rectangle net BATT: 35.281,62.941 39.421,70.434
  rectangle net BATT: 37.567,57.887 39.421,70.434
  rectangle net GND: 12.914,43.739 18.364,55.397
  rectangle net GND: 12.914,54.534 19.67,70.231
  rectangle net BATT#: 19.914,54.534 26.67,70.231
  pour cut-out: 39.573,48.971 52.527,48.971 52.527,36.855 39.573,36.855
  pour cut-out: 76.835,50.063 92.659,50.063 92.659,35.103 76.835,35.103
Bottom Layer:
  rectangle net GND: 174.803,25.019 176.911,31.115
  rectangle net NetD1_1: 30.023,67.031 35.179,70.256
  rectangle net NetD1_1: 30.023,52.095 31.09,70.256
  region net BATT#: 26.67,70.206 19.914,70.206 19.914,54.508 26.67,54.508
  rectangle net 24V: 55.677,19.329 74.092,24.968
  rectangle net 5V: 57.201,56.083 100.406,58.496
  rectangle net BATT: 27.127,45.999 29.769,70.434
  rectangle net BATT: 27.127,45.999 91.237,50.216
  rectangle net 24V: 99.746,39.192 103.175,53.848
  rectangle net 24V: 55.702,39.192 103.175,45.568
  rectangle net BATT: 74.701,46.355 91.237,55.88
  rectangle net 3.3V: 121.209,61.544 125.324,65.786
  region net GND: 165.964,12.141 156.989,12.141 156.989,0.127 165.964,0.127
  rectangle net 3.3V: 184.353,60.122 208.102,61.62
  rectangle net 3.3V: 205.994,56.642 208.102,61.62
  rectangle net 3.3V: 195.097,34.62 214.63,35.687
  rectangle net 3.3V: 125.222,33.934 127.483,40.488
  rectangle net GND: 219.761,3.962 222.352,54.635
  rectangle net GND: 157.48,0.127 218.897,1.6
  rectangle net GND: 218.669,50.571 221.539,54.635
  rectangle net EARTH: 24.155,15.215 176.835,17.653
  rectangle net 5V: 31.267,52.095 42.012,54.534
  region net 5V: 60.223,68.77 56.483,68.77 56.483,52.095 60.223,52.095
  rectangle net 5V: 41.808,52.248 45.415,70.155
  rectangle net 5V: 41.834,52.095 60.089,61.468
  rectangle net 3.3V: 8.611,34.569 25.4,35.433
  rectangle net 3.3V: 23.038,32.309 25.4,35.408
  rectangle net GND: 33.045,55.626 38.202,61.062
  rectangle net 3.3V: 54.712,32.283 61.189,33.782
  rectangle net 3.3V: 52.07,33.452 61.189,34.569
  rectangle net 3.3V: 136.911,34.747 184.506,39.903
  rectangle net GND: 125.12,57.404 143.002,59.665
  rectangle net GND: 125.12,56.515 126.314,59.665
  rectangle net GND: 121.31,58.776 143.002,59.665
  rectangle net GND: 121.31,54.661 122.377,59.665
  rectangle net 3.3V: 178.587,53.594 185.369,54.661
  rectangle net GND: 170.612,61.646 180.162,64.668
  rectangle net GND: 170.612,63.246 200.99,64.999
  rectangle net GND: 184.887,63.246 201.092,65.989
  rectangle net 3.3V: 122.657,53.975 124.917,58.369
  rectangle net 3.3V: 121.59,49.2 123.876,54.28
  rectangle net BATT: 36.043,42.596 39.192,44.018
  rectangle net BATT: 36.043,41.554 39.192,44.018
  rectangle net 3.3V: 32.893,26.035 33.807,33.122
  rectangle net 3.3V: 29.134,32.309 33.807,33.122
  rectangle net 3.3V: 69.164,26.01 70.079,33.096
  rectangle net 3.3V: 65.507,32.283 70.079,33.096
  rectangle net 3.3V: 105.263,26.073 106.177,33.16
  rectangle net 3.3V: 101.605,32.347 106.177,33.16
  rectangle net 3.3V: 140.569,26.06 145.567,33.147
  rectangle net 3.3V: 136.911,32.334 145.567,35.687
  rectangle net 3.3V: 177.089,26.035 184.506,35.687
  rectangle net 3.3V: 173.38,32.309 178.105,35.687
  rectangle net 3.3V: 210.058,32.309 214.63,35.687
  rectangle net 3.3V: 213.716,26.035 214.63,33.122
  region net 24V: 156.808,12.141 148.273,12.141 148.273,0.127 156.808,0.127
  region net 24V: 156.808,0.127 156.808,7.29 112.409,7.29 112.409,0.127
  rectangle net 24V: 73.855,0.127 82.389,12.141
  rectangle net 24V: 109.738,0.127 121.285,12.141
  region net 24V: 118.254,0.127 118.254,7.29 73.855,7.29 73.855,0.127
  region net 12V: 44.704,0.127 44.704,7.29 0.305,7.29 0.305,0.127
  rectangle net 12V: 36.188,0.127 44.723,12.141
  rectangle net 12V: 0.305,0.127 8.839,12.141

## Silkscreen, mask and mechanical layers (free items; w line width, h text height)
Top Overlay:
  drawing of 3075 lines, arcs and shapes, not listed
  text "KEYPAD HEADER" at 123.141,66.475 h1.52
  text "LCD HEADER" at 164.617,66.475 h1.52
  text "PROGRAMING HEADER" at 146.533,65.303 h1.52
  text "RESET" at 102.228,64.606 h1.52
  text "BOOT0" at 112.217,64.454 h1.52
  text "VALVE MANUAL CONTROL" at 41.758,62.128 h1.52
  text "SCHEDULE DOWNLOAD" at 71.711,62.128 h1.52
  text "STOP BUTTON" at 56.845,62.078 h1.52
  text "POWER INPUT" at 14.58,60.695 h1.52
  text "SIDE-MAIN PCB CONNECTOR" at 216.473,53.213 h1.52 r90
  text "ZERO CARBON FOOTPRINT" at 191.135,40.005 h0.97
  text "RS485 CH1" at 18.136,12.226 h1.52
  text "RS485 CH2" at 54.923,12.226 h1.52
  text "RS485 CH3" at 92.59,12.226 h1.52
  text "RS485 CH4" at 130.256,12.226 h1.52
  text "RS485 CH5" at 167.923,12.226 h1.52
  text "RS485 CH6" at 208.204,10.389 h1.52
Bottom Overlay:
  drawing of 20812 lines, arcs and shapes, not listed
  text "ZERO CARBON FOOTPRINT" at 205.74,3.81 h0.97
Board Outline:
  the board outline again, w0.254

## Dimensions
0,70.561 to 0,0 on Dimension
0,70.561 to 222.504,70.561 on Dimension